# EAGLE board Keyboard_C64_noFrame (EAGLE 9.6.0)
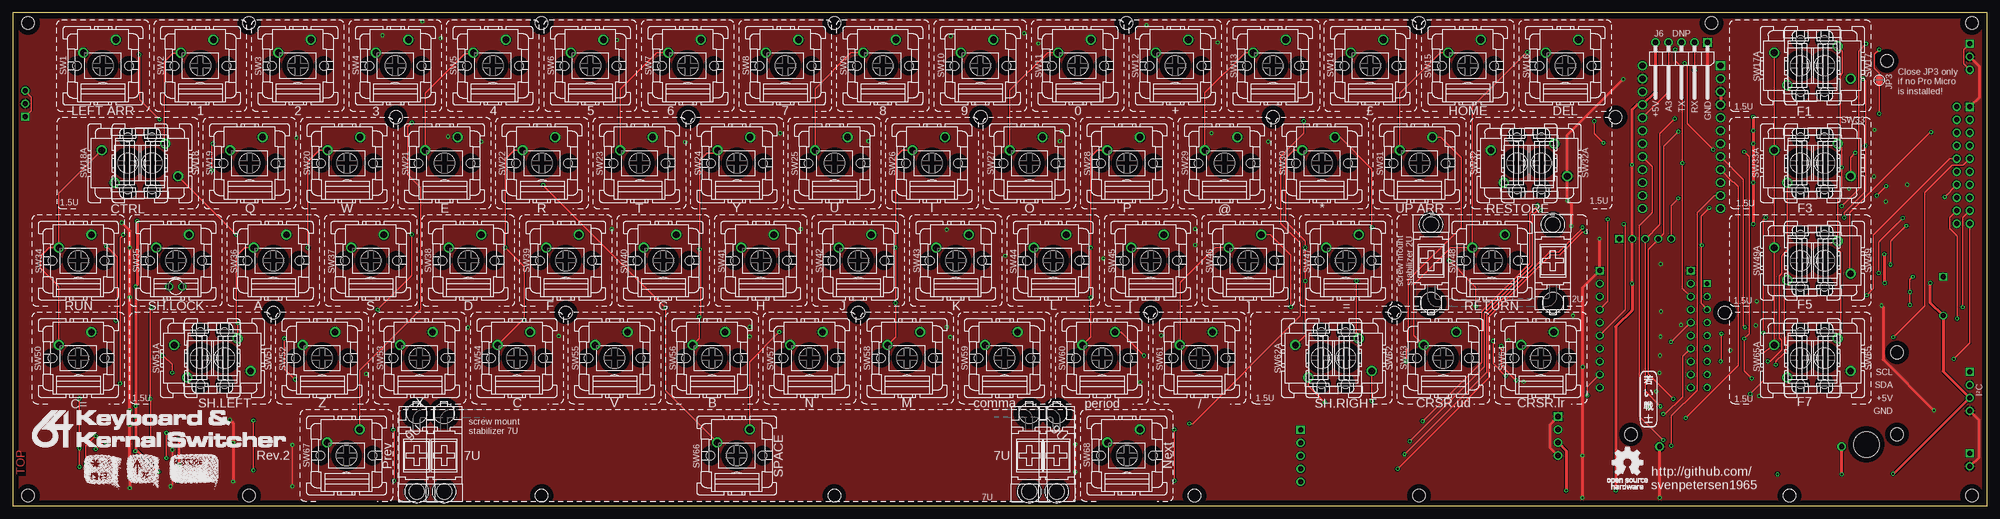
[diagram p0: board, top side]
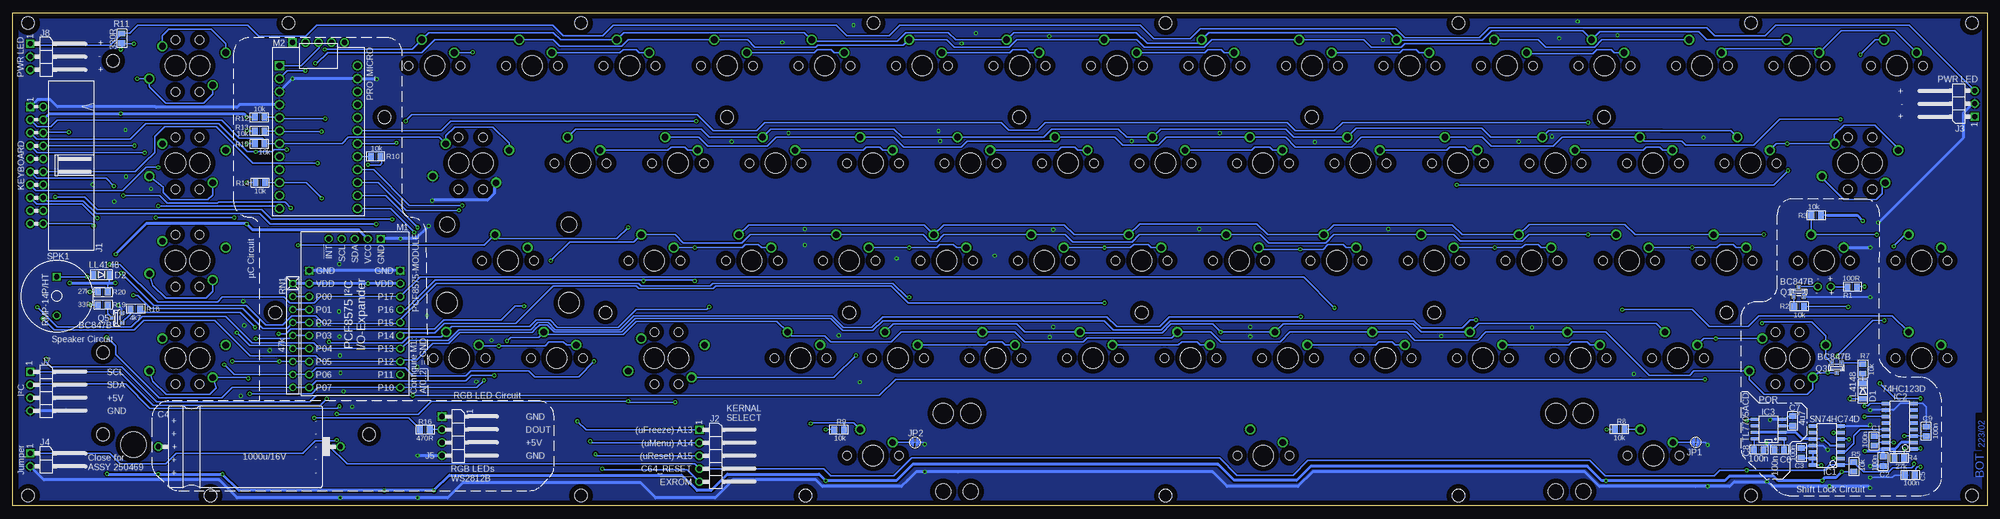
[diagram p1: board, bottom side, seen from below]

Size 385.6 x 96.4 mm. Coordinates in mm from the lower left corner, seen from the top.
Outline: 0,0 385.6,0 385.6,96.4 0,96.4 0,0
Copper layers (1*16): Top 0.035mm / dielectric 1.5mm / Bottom 0.035mm
Design rules "default *": minimum track width 6mil, minimum drill 0.35mm, track to track 6mil, track to pad 6mil, pad to pad 6mil, via to via 6mil, smd to smd 6mil, copper to edge 40mil, drill to drill 6mil, minimum pad ring 10mil, minimum via ring 8mil, stop-mask expansion 4mil, vias tented up to drill 25mil, thermal gap 10mil
Holes 2.5 mm at 3,94.4 3,2 46.16,94.4 103.29,94.4 160.44,94.4 217.52,94.4 274.64,94.4 331.76,94.4 382.6,94.4 46.16,2 103.29,2 160.44,2 274.64,2 347,2 382.6,2 74.8,76 131.92,76 189.04,76 246.14,76 313,76 50.88,37.8 108,37.8 165.12,37.8 222.24,37.8 269.84,37.8 334.34,37.8 230.8,2 316,14 368,14 368,30 366,87
Holes 5 mm at 362,12
tRestrict: area 1,92.4 to 5,96.4; area 44.2,92.4 to 48.2,96.4; area 101.3,92.4 to 105.3,96.4; area 158.4,92.4 to 162.4,96.4; area 215.5,92.4 to 219.5,96.4; area 272.6,92.4 to 276.6,96.4; area 329.8,92.4 to 333.8,96.4; area 380.6,92.4 to 384.6,96.4; area 72.8,74 to 76.8,78; area 129.9,74 to 133.9,78; area 187,74 to 191,78; area 244.1,74 to 248.1,78; 25 more areas
bRestrict: area 1,92.4 to 5,96.4; area 44.2,92.4 to 48.2,96.4; area 101.3,92.4 to 105.3,96.4; area 158.4,92.4 to 162.4,96.4; area 215.5,92.4 to 219.5,96.4; area 272.6,92.4 to 276.6,96.4; area 329.8,92.4 to 333.8,96.4; area 380.6,92.4 to 384.6,96.4; area 72.8,74 to 76.8,78; area 129.9,74 to 133.9,78; area 187,74 to 191,78; area 244.1,74 to 248.1,78; 25 more areas; 3 lines

## Footprints (pad centres in the part's own frame; a part is rotated, then mirrored left to right if it is on the bottom)
0805 = smd 1.092 x 1.397: 1 -0.94,0; 2 0.94,0
C30X16L = drill 1.016 pad 1.651: A -17.78,0; K 17.78,0
SOD80C = smd 1 x 1.6: A -1.5,0; K 1.5,0
SO-14 = smd 0.61 x 1.524: 1 -3.81,-2.794; 2 -2.54,-2.794; 3 -1.27,-2.794; 4 0,-2.794; 5 1.27,-2.794; 6 2.54,-2.794; 7 3.81,-2.794; 8 3.81,2.667; 9 2.54,2.667; 10 1.27,2.667; 11 0,2.667; 12 -1.27,2.667; 13 -2.54,2.667; 14 -3.81,2.667
SO-16 = smd 0.61 x 1.524: 1 -3.81,-2.819; 2 -2.54,-2.819; 3 -1.27,-2.819; 4 0,-2.819; 5 1.27,-2.819; 6 2.54,-2.819; 7 3.81,-2.819; 8 5.08,-2.819; 9 5.08,2.692; 10 3.81,2.692; 11 2.54,2.692; 12 1.27,2.692; 13 0,2.692; 14 -1.27,2.692; 15 -2.54,2.692; 16 -3.81,2.692
SO8 = smd 0.6 x 1.5: 1 -1.905,-2.699; 2 -0.635,-2.699; 3 0.635,-2.699; 4 1.905,-2.699; 5 1.905,2.699; 6 0.635,2.699; 7 -0.635,2.699; 8 -1.905,2.699
2X10WH = drill 1 pad 1.626 square: 1 -11.43,-1.27 | drill 1 pad 1.626: 2 -11.43,1.27; 3 -8.89,-1.27; 4 -8.89,1.27; 5 -6.35,-1.27; 6 -6.35,1.27; 7 -3.81,-1.27; 8 -3.81,1.27; 9 -1.27,-1.27; 10 -1.27,1.27; 11 1.27,-1.27; 12 1.27,1.27; 13 3.81,-1.27; 14 3.81,1.27; 15 6.35,-1.27; 16 6.35,1.27; 17 8.89,-1.27; 18 8.89,1.27; 19 11.43,-1.27; 20 11.43,1.27
1X05/90 = drill 1 pad 1.626 square: 1 -5.08,0 | drill 1 pad 1.626: 2 -2.54,0; 3 0,0; 4 2.54,0; 5 5.08,0
1X03/90 = drill 1 pad 1.626 square: 1 -2.54,0 | drill 1 pad 1.626: 2 0,0; 3 2.54,0
1X02/90 = drill 1 pad 1.626 square: 1 -1.27,0 | drill 1 pad 1.626: 2 1.27,0
1X04/90 = drill 1 pad 1.626 square: 1 -3.81,0 | drill 1 pad 1.626: 2 -1.27,0; 3 1.27,0; 4 3.81,0
CP_CL = smd 0.152 x 0.152: 1 -0.4,0; 2 0.4,0
CP_OP = smd 0.152 x 0.152: 1 -0.4,0; 2 0.4,0
PCF8575MODUL = drill 1 square: A1 -8.89,-8.5; B1 8.89,-8.5; C1 -5.08,-14.7 | drill 1: A2 -8.89,-5.96; A3 -8.89,-3.42; A4 -8.89,-0.88; A5 -8.89,1.66; A6 -8.89,4.2; A7 -8.89,6.74; A8 -8.89,9.28; A9 -8.89,11.82; A10 -8.89,14.36; B2 8.89,-5.96; B3 8.89,-3.42; B4 8.89,-0.88; B5 8.89,1.66; B6 8.89,4.2; B7 8.89,6.74; B8 8.89,9.28; B9 8.89,11.82; B10 8.89,14.36; C2 -2.54,-14.7; C3 0,-14.7; C4 2.54,-14.7; C5 5.08,-14.7
PRO_MICRO = drill 1.2 square: 1 -7.62,13.97 | drill 1.2: 2 -7.62,11.43; 3 -7.62,8.89; 4 -7.62,6.35; 5 -7.62,3.81; 6 -7.62,1.27; 7 -7.62,-1.27; 8 -7.62,-3.81; 9 -7.62,-6.35; 10 -7.62,-8.89; 11 -7.62,-11.43; 12 -7.62,-13.97; 13 7.62,-13.97; 14 7.62,-11.43; 15 7.62,-8.89; 16 7.62,-6.35; 17 7.62,-3.81; 18 7.62,-1.27; 19 7.62,1.27; 20 7.62,3.81; 21 7.62,6.35; 22 7.62,8.89; 23 7.62,11.43; 24 7.62,13.97
SOT23 = smd 0.8 x 0.9: 1 -0.953,-0.953; 2 0.953,-0.953; 3 0,0.953
RN-9 = drill 0.889 pad 1.397 square: 1 -10.16,0 | drill 0.889 pad 1.397: 2 -7.62,0; 3 -5.08,0; 4 -2.54,0; 5 0,0; 6 2.54,0; 7 5.08,0; 8 7.62,0; 9 10.16,0
RMP-14P/HT = drill 1 square: 1 0,3.8 | drill 1: 2 0,-3.8
CHERRYMX = drill 1.3: 1 -3.81,2.54; 2 2.54,5.08 | hole 4: 0,0 | hole 1.7: 5.08,0; -5.08,0
CHERRYMXLD = drill 1.3: 1 -3.81,2.54; 2 2.54,5.08 | drill 1: LDA -1.27,-5.08; LDC 1.27,-5.08 | hole 4: 0,0 | hole 1.7: -5.08,0; 5.08,0
STABIL_PIN_SCREW_L = hole 3: 0,7.05 | hole 4: 0,-8.24
STABIL_PIN_SCREW = hole 3: 0,7.05 | hole 4: 0,-8.24

## Placement (x,y rotation side)
C1  100n  [0805]  22.07,12.7 90 bottom
C2  100n  [0805]  20.32,8.73 90 bottom
C3  100n  [0805]  36.3,10.4 270 bottom
C4  1000u/16V  [C30X16L]  339.41,11.59 0 bottom
C5  100n  [0805]  15.08,6.03 0 bottom
C6  100n  [0805]  40.6,11 0 bottom
C7  4u7  [0805]  38,16.6 270 bottom
C8  100n  [0805]  44.6,11 0 bottom
C9  100n  [0805]  11.91,14.61 270 bottom
D1  LL4148  [SOD80C]  24.3,22.4 90 bottom
D2  LL4148  [SOD80C]  368.26,45.17 0 bottom
IC1  SN74HC74D  [SO-14]  31.4,11.8 90 bottom
IC2  74HC123D  [SO-16]  17.14,14.92 90 bottom
IC3  TL7705ACD  [SO8]  42.7,15 90 bottom
J1  [2X10WH]  380.93,66.6 270 bottom
J2  [1X05/90]  251.5,9.8 270 bottom
J3  [1X03/90]  2.42,78.62 90 bottom
J4  [1X02/90]  382.2,9 270 bottom
J5  [1X04/90]  301.78,13.65 270 bottom
J6  [1X05/90]  325.9,90.6 180 top
J7  [1X04/90]  382.2,22.4 270 bottom
J8  [1X03/90]  382.2,87.8 270 bottom
JP1  [CP_CL]  56.92,12.41 180 bottom
JP2  [CP_CL]  209.4,12.4 180 bottom
JP3  [CP_OP]  364.5,83.21 270 top
M1  PCF8575-MODULE  [PCF8575MODUL]  318.8,37.5 180 bottom
M2  PRO_MICRO  [PRO_MICRO]  325.9,72.1 0 bottom
Q1  BC847B  [SOT23]  36.79,41.82 0 bottom
Q3  BC847B  [SOT23]  29.4,27 180 bottom
Q5  BC847B  [SOT23]  365.26,36.73 90 bottom
R1  100R  [0805]  26.37,42.82 0 bottom
R2  10k  [0805]  36.75,39.02 0 bottom
R3  10k  [0805]  33.43,56.82 0 bottom
R4  27k  [0805]  17.14,9.37 180 bottom
R5  10k  [0805]  26.04,7.62 270 bottom
R7  10k  [0805]  24.3,26.8 90 bottom
R8  10k  [0805]  71.81,15.01 180 bottom
R9  10k  [0805]  224.23,14.89 180 bottom
R10  10k  [0805]  314.7,68.3 180 bottom
R11  330R  [0805]  364.3,91.4 270 bottom
R12  10k  [0805]  337.4,76 180 bottom
R13  10k  [0805]  337.4,73.3 180 bottom
R14  10k  [0805]  337.3,63.2 180 bottom
R15  10k  [0805]  337.4,70.8 180 bottom
R16  470R  [0805]  305.12,14.92 0 bottom
R18  4k7  [0805]  361.65,38.52 0 bottom
R19  33R  [0805]  368,39.3 0 bottom
R20  27k  [0805]  368,41.8 0 bottom
RN1  47k  [RN-9]  330.9,33.3 270 bottom
SPK1  RMP-14P/HT  [RMP-14P/HT]  377,41 0 bottom
SW1  MX  [CHERRYMX]  17.6,86.05 0 top
SW2  MX  [CHERRYMX]  36.64,86.05 0 top
SW3  MX  [CHERRYMX]  55.68,86.05 0 top
SW4  MX  [CHERRYMX]  74.72,86.05 0 top
SW5  MX  [CHERRYMX]  93.76,86.05 0 top
SW6  MX  [CHERRYMX]  112.8,86.05 0 top
SW7  MX  [CHERRYMX]  131.84,86.05 0 top
SW8  MX  [CHERRYMX]  150.88,86.05 0 top
SW9  MX  [CHERRYMX]  169.92,86.05 0 top
SW10  MX  [CHERRYMX]  188.96,86.05 0 top
SW11  MX  [CHERRYMX]  208,86.05 0 top
SW12  MX  [CHERRYMX]  227.04,86.05 0 top
SW13  MX  [CHERRYMX]  246.08,86.05 0 top
SW14  MX  [CHERRYMX]  265.12,86.05 0 top
SW15  MX  [CHERRYMX]  284.16,86.05 0 top
SW16  MX  [CHERRYMX]  303.2,86.05 0 top
SW17  MX  [CHERRYMX]  353.85,86.05 270 top
SW17A  MX  [CHERRYMX]  349.1,86.05 90 top
SW18  MX  [CHERRYMX]  27.2,67 270 top
SW18A  MX  [CHERRYMX]  22.45,67 90 top
SW19  MX  [CHERRYMX]  46.24,67 0 top
SW20  MX  [CHERRYMX]  65.28,67 0 top
SW21  MX  [CHERRYMX]  84.32,67 0 top
SW22  MX  [CHERRYMX]  103.36,67 0 top
SW23  MX  [CHERRYMX]  122.4,67 0 top
SW24  MX  [CHERRYMX]  141.44,67 0 top
SW25  MX  [CHERRYMX]  160.48,67 0 top
SW26  MX  [CHERRYMX]  179.52,67 0 top
SW27  MX  [CHERRYMX]  198.56,67 0 top
SW28  MX  [CHERRYMX]  217.6,67 0 top
SW29  MX  [CHERRYMX]  236.64,67 0 top
SW30  MX  [CHERRYMX]  255.68,67 0 top
SW31  MX  [CHERRYMX]  274.72,67 0 top
SW32  MX  [CHERRYMX]  293.76,67 90 top
SW32A  MX  [CHERRYMX]  298.51,67 270 top
SW33  MX  [CHERRYMX]  353.85,67 270 top
SW33A  MX  [CHERRYMX]  349.1,67 90 top
SW34  MX  [CHERRYMX]  12.8,47.95 0 top
SW35  MX+LED  [CHERRYMXLD]  31.84,47.95 0 top
SW36  MX  [CHERRYMX]  50.88,47.95 0 top
SW37  MX  [CHERRYMX]  69.92,47.95 0 top
SW38  MX  [CHERRYMX]  88.96,47.95 0 top
SW39  MX  [CHERRYMX]  108,47.95 0 top
SW40  MX  [CHERRYMX]  127.04,47.95 0 top
SW41  MX  [CHERRYMX]  146.08,47.95 0 top
SW42  MX  [CHERRYMX]  165.12,47.95 0 top
SW43  MX  [CHERRYMX]  184.16,47.95 0 top
SW44  MX  [CHERRYMX]  203.2,47.95 0 top
SW45  MX  [CHERRYMX]  222.24,47.95 0 top
SW46  MX  [CHERRYMX]  241.28,47.95 0 top
SW47  MX  [CHERRYMX]  260.32,47.95 0 top
SW48  MX  [CHERRYMX]  288.88,47.95 0 top
SW49  MX  [CHERRYMX]  353.85,47.95 270 top
SW49A  MX  [CHERRYMX]  349.1,47.95 90 top
SW50  MX  [CHERRYMX]  12.8,28.9 0 top
SW51  MX  [CHERRYMX]  41.36,28.9 270 top
SW51A  MX  [CHERRYMX]  36.61,28.9 90 top
SW52  MX  [CHERRYMX]  60.4,28.9 0 top
SW53  MX  [CHERRYMX]  79.44,28.9 0 top
SW54  MX  [CHERRYMX]  98.48,28.9 0 top
SW55  MX  [CHERRYMX]  117.52,28.9 0 top
SW56  MX  [CHERRYMX]  136.56,28.9 0 top
SW57  MX  [CHERRYMX]  155.6,28.9 0 top
SW58  MX  [CHERRYMX]  174.64,28.9 0 top
SW59  MX  [CHERRYMX]  193.68,28.9 0 top
SW60  MX  [CHERRYMX]  212.72,28.9 0 top
SW61  MX  [CHERRYMX]  231.76,28.9 0 top
SW62  MX  [CHERRYMX]  260.32,28.9 270 top
SW62A  MX  [CHERRYMX]  255.57,28.9 90 top
SW63  MX  [CHERRYMX]  279.36,28.9 0 top
SW64  MX  [CHERRYMX]  298.4,28.9 0 top
SW65  MX  [CHERRYMX]  353.85,28.9 270 top
SW65A  MX  [CHERRYMX]  349.1,28.9 90 top
SW66  MX  [CHERRYMX]  141.38,9.85 0 top
SW67  MX  [CHERRYMX]  65.18,9.85 0 top
SW68  MX  [CHERRYMX]  217.58,9.85 0 top
U$90  OPEN_SOURCE_HW  [OPENHW]  311.4,3.27 0 top
U$92  [KCAP_1_5U]  349.1,86.05 0 top
U$93  [KCAP_1_5U]  349.1,67 0 top
U$94  [KCAP_1_5U]  349.1,47.95 0 top
U$95  [KCAP_1_5U]  349.1,28.9 0 top
U$96  [KCAP_1_5U]  255.57,28.9 0 top
U$97  [KCAP_1_5U]  22.45,67 0 top
U$98  [KCAP_1_5U]  36.61,28.9 0 top
U$99  [KCAP_1U]  65.18,9.85 0 top
U$100  [KCAP_1U]  217.58,9.85 0 top
U$101  [KCAP_1U]  17.6,86.05 0 top
U$102  [KCAP_1U]  303.2,86.05 0 top
U$103  [KCAP_1U]  298.4,28.9 0 top
U$104  [KCAP_7U]  141.38,9.85 0 top
U$105  [KCAP_2U]  288.88,47.95 0 top
U$106  [KCAP_1_5U]  298.51,67 0 top
U$107  [KCAP_1U]  12.8,47.95 0 top
U$108  [KCAP_1U]  12.8,28.9 0 top
U$109  [KCAP_1U]  36.64,86.05 0 top
U$110  [KCAP_1U]  55.68,86.05 0 top
U$111  [KCAP_1U]  74.72,86.05 0 top
U$112  [KCAP_1U]  93.76,86.05 0 top
U$113  [KCAP_1U]  112.8,86.05 0 top
U$114  [KCAP_1U]  131.84,86.05 0 top
U$115  [KCAP_1U]  150.88,86.05 0 top
U$116  [KCAP_1U]  169.92,86.05 0 top
U$117  [KCAP_1U]  188.96,86.05 0 top
U$118  [KCAP_1U]  208,86.05 0 top
U$119  [KCAP_1U]  227.04,86.05 0 top
U$120  [KCAP_1U]  246.2,86.05 0 top
U$121  [KCAP_1U]  265.12,86.05 0 top
U$122  [KCAP_1U]  284.16,86.05 0 top
U$123  [KCAP_1U]  46.24,67 0 top
U$124  [KCAP_1U]  65.28,67 0 top
U$125  [KCAP_1U]  84.32,67 0 top
U$126  [KCAP_1U]  103.36,67 0 top
U$127  [KCAP_1U]  122.4,67 0 top
U$128  [KCAP_1U]  141.44,67 0 top
U$129  [KCAP_1U]  160.48,67 0 top
U$130  [KCAP_1U]  179.52,67 0 top
U$131  [KCAP_1U]  198.56,67 0 top
U$132  [KCAP_1U]  217.6,67 0 top
U$133  [KCAP_1U]  236.64,67 0 top
U$134  [KCAP_1U]  255.68,67 0 top
U$135  [KCAP_1U]  274.72,67 0 top
U$136  [KCAP_1U]  50.88,47.95 0 top
U$137  [KCAP_1U]  69.92,47.95 0 top
U$138  [KCAP_1U]  88.96,47.95 0 top
U$139  [KCAP_1U]  108,47.95 0 top
U$140  [KCAP_1U]  127.04,47.95 0 top
U$141  [KCAP_1U]  146.08,47.95 0 top
U$142  [KCAP_1U]  165.12,47.95 0 top
U$143  [KCAP_1U]  184.16,47.95 0 top
U$144  [KCAP_1U]  203.2,47.95 0 top
U$145  [KCAP_1U]  222.24,47.95 0 top
U$146  [KCAP_1U]  241.28,47.95 0 top
U$147  [KCAP_1U]  260.32,47.95 0 top
U$148  [KCAP_1U]  31.84,47.95 0 top
U$149  [KCAP_1U]  60.4,28.9 0 top
U$150  [KCAP_1U]  79.44,28.9 0 top
U$151  [KCAP_1U]  98.48,28.9 0 top
U$152  [KCAP_1U]  117.52,28.9 0 top
U$153  [KCAP_1U]  136.56,28.9 0 top
U$154  [KCAP_1U]  155.6,28.9 0 top
U$155  [KCAP_1U]  174.64,28.9 0 top
U$156  [KCAP_1U]  193.68,28.9 0 top
U$157  [KCAP_1U]  212.72,28.9 0 top
U$158  [KCAP_1U]  231.76,28.9 0 top
U$159  [KCAP_1U]  279.36,28.9 0 top
U$161  [2LAYER]  2.32,6.05 90 top
U$164  [C64_KEYS]  13.83,2.65 0 top
U$172  [STABIL_PIN_SCREW_L]  276.98,47.95 0 top
U$173  [STABIL_PIN_SCREW]  300.78,47.94 0 top
U$174  [STABIL_PIN_SCREW]  84.23,9.85 180 top
U$175  [STABIL_PIN_SCREW_L]  198.53,9.85 180 top
U$176  [64KB]  3.8,11.5 0 top
U$178  [SVEN_TAG]  319.5,21 0 top
U$180  [STABIL_PIN_SCREW]  78.88,9.85 180 top
U$181  [STABIL_PIN_SCREW_L]  203.88,9.85 180 top

## Library data of the parts
C1-C3 C5 R1-R5 R7-R10 R12-R16 R18-R20 = SMD
C4 = ELCO
C6-C9 R11 RN1 = DISCRETE
D1 D2 = Dioden
IC1 IC2 = 74XXsmd
IC3 = Texas_Instruments
J1-J8 = PINHEAD
JP1-JP3 = Cutpad
M1 M2 = Arduino
Q1 Q3 Q5 = Transistoren
SPK1 = KM
SW1 = CherryMX; KEY: LEFT ARR
SW2 = CherryMX; KEY: 1
SW3 = CherryMX; KEY: 2
SW4 = CherryMX; KEY: 3
SW5 = CherryMX; KEY: 4
SW6 = CherryMX; KEY: 5
SW7 = CherryMX; KEY: 6
SW8 = CherryMX; KEY: 7
SW9 = CherryMX; KEY: 8
SW10 = CherryMX; KEY: 9
SW11 = CherryMX; KEY: 0
SW12 = CherryMX; KEY: +
SW13 = CherryMX; KEY: -
SW14 = CherryMX; KEY: £
SW15 = CherryMX; KEY: HOME
SW16 = CherryMX; KEY: DEL
SW17 SW17A = CherryMX; KEY: F1
SW18 SW18A = CherryMX; KEY: CTRL
SW19 = CherryMX; KEY: Q
SW20 = CherryMX; KEY: W
SW21 = CherryMX; KEY: E
SW22 = CherryMX; KEY: R
SW23 = CherryMX; KEY: T
SW24 = CherryMX; KEY: Y
SW25 = CherryMX; KEY: U
SW26 = CherryMX; KEY: I
SW27 = CherryMX; KEY: O
SW28 = CherryMX; KEY: P
SW29 = CherryMX; KEY: @
SW30 = CherryMX; KEY: *
SW31 = CherryMX; KEY: UP ARR
SW32 SW32A = CherryMX; KEY: RESTORE
SW33 SW33A = CherryMX; KEY: F3
SW34 = CherryMX; KEY: RUN
SW35 = CherryMX; KEY: SH.LOCK
SW36 = CherryMX; KEY: A
SW37 = CherryMX; KEY: S
SW38 = CherryMX; KEY: D
SW39 = CherryMX; KEY: F
SW40 = CherryMX; KEY: G
SW41 = CherryMX; KEY: H
SW42 = CherryMX; KEY: J
SW43 = CherryMX; KEY: K
SW44 = CherryMX; KEY: L
SW45 = CherryMX; KEY: [
SW46 = CherryMX; KEY: ]
SW47 = CherryMX; KEY: =
SW48 = CherryMX; KEY: RETURN
SW49 SW49A = CherryMX; KEY: F5
SW50 = CherryMX; KEY: C=
SW51 SW51A = CherryMX; KEY: SH.LEFT
SW52 = CherryMX; KEY: Z
SW53 = CherryMX; KEY: X
SW54 = CherryMX; KEY: C
SW55 = CherryMX; KEY: V
SW56 = CherryMX; KEY: B
SW57 = CherryMX; KEY: N
SW58 = CherryMX; KEY: M
SW59 = CherryMX; KEY: comma
SW60 = CherryMX; KEY: period
SW61 = CherryMX; KEY: /
SW62 SW62A = CherryMX; KEY: SH.RIGHT
SW63 = CherryMX; KEY: CRSR.ud
SW64 = CherryMX; KEY: CRSR.lr
SW65 SW65A = CherryMX; KEY: F7
SW66 = CherryMX; KEY: SPACE
SW67 = CherryMX; KEY: Prev
SW68 = CherryMX; KEY: Next
U$90 U$164 U$176 U$178 = Logo
U$92-U$159 U$172-U$175 U$180 U$181 = CherryMX
U$161 = I-TEILE

## Nets
!C64RES: C9.2 IC1.1 IC2.3 IC3.5 J2.4 M2.11 R5.1
!EXROM: J2.5 M2.13
!INT6: M1.C5 M2.10 R14.1
!LOCK: C5.2 IC2.1 R3.1 SW35.2
!P1: M2.18 R8.1 SW67.2
!P2: M2.19 R9.1 SW68.2
!RESTORE: J1.3 M2.7 R15.1 SW32.2 SW32A.1
!SHORT_BRD: J4.1 M2.17 R10.2
+5V: C2.2 C3.2 C4.A D2.K IC1.4 IC1.10 IC1.12 IC1.13 IC1.14 IC2.2 IC2.9 IC2.11 IC2.16 IC3.2 IC3.7 J1.4 J5.3 J6.5 J7.3 JP3.2 M1.A2 M1.B2 M1.C2 M2.21 R1.2 R3.2 R4.2 R5.2 R8.2 R9.2 R10.1 R12.2 R13.2 R14.2 R15.2 R20.2 RN1.1 SPK1.2
A3: J6.4 M2.20
COL0: J1.13 M1.A10 SW16.1 SW17.1 SW17A.2 SW33.1 SW33A.2 SW48.1 SW49.1 SW49A.2 SW63.1 SW64.1 SW65.1 SW65A.2
COL1: J1.19 M1.A9 Q3.2 SW4.1 SW5.1 SW20.1 SW21.1 SW36.1 SW37.1 SW51.1 SW51A.2 SW52.1
COL2: J1.18 M1.A8 SW6.1 SW7.1 SW22.1 SW23.1 SW38.1 SW39.1 SW53.1 SW54.1
COL3: J1.17 M1.A7 SW8.1 SW9.1 SW24.1 SW25.1 SW40.1 SW41.1 SW55.1 SW56.1
COL4: J1.16 M1.A6 SW10.1 SW11.1 SW26.1 SW27.1 SW42.1 SW43.1 SW57.1 SW58.1
COL5: J1.15 M1.A5 SW12.1 SW13.1 SW28.1 SW29.1 SW44.1 SW45.1 SW59.1 SW60.1
COL6: J1.14 M1.A4 SW14.1 SW15.1 SW30.1 SW31.1 SW46.1 SW47.1 SW61.1 SW62.1 SW62A.2
COL7: J1.20 M1.A3 SW1.1 SW2.1 SW3.1 SW18.1 SW18A.2 SW19.1 SW34.1 SW50.1 SW66.1
GND: C2.1 C3.1 C4.K C5.1 C6.1 C7.1 C8.2 C9.1 IC1.7 IC1.11 IC2.8 IC2.10 IC3.4 J1.1 J3.2 J4.2 J5.1 J5.4 J6.1 J7.4 J8.2 JP1.1 JP2.1 M1.A1 M1.B1 M1.C1 M2.3 M2.4 M2.23 Q1.2 Q5.2 SW32.1 SW32A.2 SW35.1
KSW_A13: J2.1 M2.16
KSW_A14: J2.2 M2.15
KSW_A15: J2.3 M2.14
LOCK: IC1.3 IC2.13
N$1: R1.1 SW35.LDA
N$2: Q1.3 SW35.LDC
N$3: Q1.1 R2.1
N$4: C1.2 IC2.14
N$5: IC1.2 IC1.6
N$7: D1.K R7.1
N$8: Q3.1 R7.2
N$9: Q5.1 R18.1
N$10: J3.1 J3.3 J8.1 J8.3 R11.1
N$11: Q5.3 R19.2
N$12: D2.A R19.1 R20.1 SPK1.1
N$13: J5.2 R16.2
N$14: JP1.2 SW67.1
N$15: JP2.2 SW68.1
N$16: C1.1 IC2.15 R4.1
N$17: C8.1 IC3.8
N$18: C6.2 IC3.1
N$19: C7.2 IC3.3
PWRLED: JP3.1 M2.12 R11.2
RAW: M2.24
RGBOUT: M2.9 R16.1
ROW0: J1.12 M1.B3 RN1.2 SW2.2 SW4.2 SW6.2 SW8.2 SW10.2 SW12.2 SW14.2 SW16.2
ROW1: J1.11 M1.B4 RN1.3 SW1.2 SW20.2 SW22.2 SW24.2 SW26.2 SW28.2 SW30.2 SW48.2
ROW2: J1.10 M1.B5 RN1.4 SW18.2 SW18A.1 SW36.2 SW38.2 SW40.2 SW42.2 SW44.2 SW46.2 SW64.2
ROW3: J1.5 M1.B6 RN1.5 SW3.2 SW5.2 SW7.2 SW9.2 SW11.2 SW13.2 SW15.2 SW65.2 SW65A.1
ROW4: J1.8 M1.B7 RN1.6 SW17.2 SW17A.1 SW52.2 SW54.2 SW56.2 SW58.2 SW60.2 SW62.2 SW62A.1 SW66.2
ROW5: J1.7 M1.B8 RN1.7 SW33.2 SW33A.1 SW37.2 SW39.2 SW41.2 SW43.2 SW45.2 SW47.2 SW50.2
ROW6: J1.6 M1.B9 RN1.8 SW19.2 SW21.2 SW23.2 SW25.2 SW27.2 SW29.2 SW31.2 SW49.2 SW49A.1
ROW7: J1.9 M1.B10 Q3.3 RN1.9 SW34.2 SW51.2 SW51A.1 SW53.2 SW55.2 SW57.2 SW59.2 SW61.2 SW63.2
RX: J6.2 M2.2
SCL: J7.1 M1.C4 M2.6 R13.1
SDA: J7.2 M1.C3 M2.5 R12.1
SHIFTLOCK: D1.A IC1.5 R2.2
SND_OUT: M2.8 R18.2
TX: J6.3 M2.1

## Tracks (layer width: path | path; a pad name or v marks a point on that pad's centre or on a via)
!C64RES  (via drill 0.35)
  Top 0.254: v323.88,11.77 323.88,17.57 328.93,22.61 328.93,57.31 332.26,60.64 333.49,60.64 M2.11 | v46.99,16.67 46.99,7.98 | 46.99,7.94 46.99,7.98 | 46.99,7.94 46.99,7.98 | v46.99,6.99 46.99,7.94 | v14.29,8.26 14.29,11.75 v16.19,13.65
  Bottom 0.254: v323.88,11.77 320.33,8.21 252.45,8.21 J2.4 227.21,7.26 225.82,5.87 213.51,5.87 210.01,9.37 149.86,9.37 146.53,6.03 135.57,6.03 132.72,8.89 77.63,8.89 74.61,5.87 53.34,5.87 52.23,6.99 v46.99,6.99 46.67,6.99 31.75,6.99 30.75,7.99 IC1.1 28.45,8.15 26.45,8.15 R5.1 24.14,6.67 19.21,6.67 18.41,7.46 14.76,7.46 14.29,7.94 v14.29,8.26 | IC3.5 46.75,16.91 v46.99,16.67 | v16.19,13.65 IC2.3 11.92,13.65 C9.2
!EXROM  (via drill 0.35)
  Top 0.254: v270.46,7.24 288.29,25.07 288.29,36.99 294.32,43.02 300.38,49.08 302.08,49.08 306.5,53.5 v307.2,53.5
  Bottom 0.254: J2.5 253.88,7.1 270.32,7.1 v270.46,7.24 | v307.2,53.5 311.81,58.1 311.81,58.13 M2.13
!INT6  (via drill 0.35)
  Top 0.254: M1.C5 323.88,58.72 v325.29,60.12
  Bottom 0.254: R14.1 M2.10 | M2.10 328.33,63.2 325.29,60.16 v325.29,60.12 | M2.10
!LOCK  (via drill 0.35)
  Top 0.254: v20.95,23.97 20.95,52.39 v21.59,53.02 | v13.02,20.99 v13.02,11.27 v13.02,7.62
  Bottom 0.254: v20.95,23.97 17.98,20.99 v13.02,20.99 | v21.59,53.02 SW35.2 34.38,56.58 33.97,56.99 34.2,56.99 R3.1 | IC2.1 13.18,11.11 v13.02,11.27 | C5.2 13.97,6.2 13.97,7.3 13.65,7.62 v13.02,7.62
!P1  (via drill 0.35)
  Top 0.254: SW67.2 67.72,26.45 79.69,38.42 79.69,62.23 77.15,64.77 77.15,74.14 v77.95,74.93 | v308.86,75.25 308.86,72.77 v310.67,70.96
  Bottom 0.254: R8.1 69.85,15.01 69.53,15.01 69.22,15.01 67.8,15.01 SW67.2 | v77.95,74.93 125.89,74.93 127.48,73.34 135.1,73.34 136.68,74.93 183.99,74.93 185.46,73.47 191.07,73.47 192.53,74.93 238.76,74.93 240.35,73.34 248.76,73.34 251.94,76.52 307.66,76.52 308.86,75.31 v308.86,75.25 | v310.67,70.96 310.83,70.8 318.25,70.8 M2.18
!P2  (via drill 0.35)
  Top 0.254: v252.09,75.25 252.09,72.87 247.65,68.42 247.65,55.24 251.46,51.44 251.46,37.15 230.4,16.09 v229.78,16.09
  Bottom 0.254: SW68.2 221.38,16.19 223.2,16.19 | R9.1 223.2,14.98 223.2,15.89 223.2,16.19 | M2.19 301.92,73.37 300.04,75.25 v252.09,75.25 | v229.78,16.09 229.68,16.19 223.2,16.19
!RESTORE
  Bottom 0.254: SW32.2 288.68,70.88 291.88,74.07 299.34,74.07 301.05,72.36 SW32A.1 302.31,72.07 320.05,72.07 321.3,70.83 M2.7 333.55,70.8 336.39,70.8 | R15.1 336.39,70.8 | 336.39,70.8 336.55,70.96 336.55,71.6 336.87,71.91 341.34,71.91 344.83,75.41 376.87,75.41 378.14,74.14 380.85,74.14 J1.3
!SHORT_BRD  (via drill 0.35)
  Top 0.254: M2.17 320.2,66.37 320.2,57.31 317.66,54.77 317.66,17.55 v322.35,12.86
  Bottom 0.254: R10.2 M2.17 | v322.35,12.86 322.49,12.72 326.5,12.72 328.96,10.27 353.7,10.31 355.76,8.26 364.65,8.26 366.66,10.27 J4.1
+5V  (via drill 0.35)
  Top 0.152: v364.5,76.68 v364.49,76.68
  Top 0.254: v74.3,14.92 74.45,14.76 v74.45,4.92 | v226.85,14.92 v226.85,4.92 | JP3.2 v364.5,76.68
  Top 0.61: v32.23,13.02 32.38,12.86 v32.38,7.94 32.38,5.08 v32.23,4.92 | v24.29,55.72 24.29,43.18 v23.97,42.86 v23.97,19.53 v23.97,17.46 23.97,10.79 v23.89,10.72 24.37,10.72 26.27,8.81 v28.42,6.67 | v339.88,76.04 v339.88,73.34 v339.88,70.8 v339.88,63.18 v339.88,55.09 | v374.49,43.58 374.49,39.71 SPK1.2 377,26.33 J7.3 367.35,6.28 v367.21,6.28 | v365.5,49.19 365.5,43.68 v365.6,43.58 | v313.06,3.02 313.06,35.05 316.23,38.22 v316.23,43.46 316.26,43.49 M1.C2 316.26,55.06 316.23,55.09 v316.23,66.67 316.23,77.47 317.21,78.45 M2.21 320.82,80.99 J6.5 | J5.3 303.37,10.79 v303.37,3.02 | v357.19,6.19 C4.A
  Bottom 0.254: R3.2 31.29,56.82 31.27,56.83 | v23.97,42.86 25.39,42.86 R1.2 | R8.2 72.83,14.92 v74.3,14.92 | R9.2 225.2,14.92 v226.85,14.92 | R12.2 339.84,76 v339.88,76.04 | R13.2 339.84,73.3 v339.88,73.34 | R15.2 v339.88,70.8 | R20.2 367.06,43.55 367.03,43.58 | D2.K 366.76,43.63 366.71,43.58 | v316.23,66.67 313.85,66.67 313.53,66.99 313.53,68.07 R10.1 | R14.2 339.87,63.2 v339.88,63.18 | R5.2 28.4,6.68 v28.42,6.67 | IC2.9 22.86,20 23.34,19.53 v23.97,19.53 | IC2.11 v23.97,17.46
  Bottom 0.406: IC1.13 IC1.14 32.44,7.99 v32.38,7.94 | IC1.4 30.69,11.8 31.91,13.02 v32.23,13.02 32.28,13.07 IC1.10 | IC1.13 36.1,9.26 C3.2 | IC1.12 IC1.13
  Bottom 0.61: 31.27,56.83 25.4,56.83 v24.29,55.72 | v28.42,6.67 29.53,5.56 31.59,5.56 v32.23,4.92 40.8,4.92 41.75,5.87 50.32,5.87 51.28,4.92 v74.45,4.92 75.25,4.92 78.11,7.78 132.08,7.78 134.87,4.99 147.09,5.01 150.18,8.1 209.86,8.1 213.03,4.92 v226.85,4.92 228.12,6.19 246.06,6.19 249.24,3.02 251.97,3.02 254.99,6.03 300.36,6.03 v303.37,3.02 v313.06,3.02 341.47,3.02 v344.65,6.19 v357.19,6.19 367.12,6.19 v367.21,6.28 | RN1.1 M1.B2 v316.23,43.46 M1.A2 | v339.88,76.04 340.52,76.68 v364.49,76.68 378.47,76.68 J1.4 | v374.49,43.58 367.03,43.58 366.71,43.58 v365.6,43.58 | v365.5,49.19 365.5,49.23 359.45,55.28 340.08,55.28 v339.88,55.09 340,55.2 338.77,53.98 318.04,53.98 M1.C2 | 20.32,11.11 IC2.16 18.1,11.11 | 20.32,11.11 20.8,11.11 21.27,10.64 23.81,10.64 v23.89,10.72 | IC2.2 16.83,12.38 18.1,11.11 | R4.2 18.09,11.1 18.1,11.11 | C2.2 20.32,11.11 | IC1.10 36.09,13.07 37.38,14.37 IC3.2 IC3.7
A3
  Top 0.254: M2.20 323.36,80.99 J6.4
COL0  (via drill 0.35)
  Top 0.254: v295.8,88.68 295.69,88.68 285.07,78.06 SW48.1 280.84,50.49 273.64,43.3 273.64,33.34 SW63.1 | v290.67,31.27 290.67,27.47 v293.57,24.57 | SW17A.2 SW33A.2 SW49A.2 SW65A.2 341.83,29.95 341.83,24.41 v339.33,21.91 | SW17.1 357.31,88.94 357.31,84.59 356.87,84.15 356.87,71.29 SW33.1 357.19,70.01 v357.19,66.2 357.19,60.8 356.39,60.01 356.39,57.31 356.39,56.2 356.39,56.19 SW49.1 356.39,50.17 357.03,49.53 357.03,33.35 SW65.1
  Bottom 0.254: v295.8,88.68 295.89,88.59 SW16.1 | SW63.1 277.45,31.44 278.06,32.04 280.88,32.04 281.65,31.27 v290.67,31.27 294.42,31.27 SW64.1 | v293.57,24.57 295,23.14 M1.A10 326,23.14 327.23,21.91 v339.33,21.91 | J1.13 381.09,61.68 364.09,61.68 359.57,66.2 v357.19,66.2 | SW17A.2 344.01,90.33 346.87,93.19 355.12,93.19 356.39,91.92 SW17.1
COL1  (via drill 0.35)
  Top 0.254: SW5.1 89.8,88.44 88.25,88.44 80.51,80.7 SW21.1 | SW20.1 59.86,69.54 57.63,67.31 v57.63,50.49 | v57.63,50.49 v57.63,50.48 v57.63,50.49 | SW51.1 43.97,32.78 v43.97,35.72 43.66,36.04 43.66,48.9 45.25,50.49 SW36.1 | v307.5,21.59 307.5,23.27 M1.A9 | v379.1,28.73 382.2,31.84 J1.19 | v55.12,24.74 55.1,24.74 53.02,26.81 v53.02,32.71
  Bottom 0.254: SW20.1 63.38,69.54 63.98,70.14 66.58,70.14 67.19,69.54 SW21.1 | SW4.1 72.81,88.59 73.42,89.19 76.22,89.19 76.99,88.42 89.78,88.42 SW5.1 | SW36.1 48.98,50.49 49.58,51.09 52.18,51.09 52.78,50.49 v57.63,50.49 SW37.1 | v43.97,35.72 43.72,35.97 34.23,35.97 31.53,33.28 SW51A.2 31.53,29.13 Q3.2 | SW51.1 v53.02,32.71 55.32,32.71 SW52.1 | v379.1,28.73 379.1,28.1 378.14,27.15 364.33,27.15 357.5,20.32 327.59,20.32 326.32,21.59 v307.5,21.59 216.38,21.59 213.2,24.77 67.79,24.77 67.76,24.74 v55.12,24.74
COL2  (via drill 0.35)
  Top 0.254: SW23.1 118.59,81.44 125.74,88.59 SW7.1 | SW22.1 97.96,69.54 96.2,67.79 v96.2,50.49 | v96.2,50.49 v96.2,50.48 v96.2,50.49 | v96.2,50.49 99.84,46.85 v99.84,36.35 99.58,36.35 SW54.1 | v379.72,36.64 v379.73,36.65 379.73,52.79 378.3,54.22 378.3,56.35 J1.18
  Bottom 0.254: SW22.1 101.45,69.54 102.06,70.14 104.96,70.14 105.57,69.53 SW23.1 | SW6.1 110.89,88.59 111.5,89.19 114.1,89.19 114.7,88.59 SW7.1 | SW38.1 87.06,50.49 87.66,51.09 90.26,51.09 90.86,50.49 v96.2,50.49 SW39.1 | SW53.1 77.53,31.44 78.14,32.04 81.15,32.04 81.76,31.43 SW54.1 | v99.84,36.35 100.97,36.35 102.55,34.77 110.58,34.77 111.99,36.17 159.54,36.2 161.29,34.45 170.66,34.45 172.4,36.2 215.74,36.2 217.65,34.29 223.49,34.29 225.83,36.64 264.04,36.63 266.7,33.97 279.84,33.97 281.27,35.4 282.57,35.4 282.73,35.4 283.53,34.61 284.18,33.95 298.27,33.95 300.5,31.73 303.56,31.73 306.74,28.54 309.59,28.54 M1.A8 325.24,28.22 326.39,29.37 339.25,29.37 346.16,36.28 360.05,36.28 361.88,34.44 377.52,34.44 v379.72,36.64 | v99.84,36.35 99.82,36.38 v99.84,36.35
COL3  (via drill 0.35)
  Top 0.254: SW25.1 156.67,81.58 163.68,88.59 SW9.1 | SW24.1 137.08,68.99 135.53,68.99 134.14,67.6 v134.14,50.16 134.34,49.97 134.34,37.28 v134.04,36.98 134.04,32.73 SW56.1 | v380.81,38.85 380.84,38.85 380.84,56.35 J1.17
  Bottom 0.254: SW24.1 139.53,69.54 140.14,70.14 143.06,70.14 143.67,69.53 SW25.1 | SW8.1 148.97,88.59 149.58,89.19 152.18,89.19 152.78,88.59 SW9.1 | SW40.1 125.14,50.49 125.74,51.09 128.77,51.09 129.7,50.16 v134.14,50.16 141.94,50.16 SW41.1 | SW55.1 115.61,31.44 116.22,32.04 118.82,32.04 119.42,31.44 SW56.1 | v134.04,36.98 134.06,36.99 159.7,36.99 161.61,35.08 170.02,35.08 171.93,36.99 215.74,36.99 217.81,34.92 223.38,34.92 225.62,37.16 264.3,37.16 267.02,34.45 279.62,34.45 281.05,35.88 283.05,35.88 284.48,34.45 298.51,34.45 300.58,32.38 308.09,32.38 309.71,30.76 M1.A7 325.72,30.76 326.87,31.91 338.86,31.91 344.02,37.07 360.36,37.07 362.44,34.99 376.94,34.99 v380.81,38.85
COL4  (via drill 0.35)
  Top 0.254: SW27.1 194.75,81.24 202.09,88.58 SW11.1 | SW26.1 173.68,69.54 172.4,68.26 v172.4,50.48 v172.4,39.69 172.4,33.01 SW58.1 | M1.A6 314.96,38.35 314.96,54.77 v314.64,55.09
  Bottom 0.254: SW26.1 177.62,69.54 178.22,70.14 180.84,70.14 181.45,69.53 SW27.1 | SW10.1 187.06,88.59 187.66,89.19 190.26,89.19 190.87,88.59 SW11.1 | SW42.1 163.22,50.49 163.82,51.09 166.71,51.09 167.32,50.48 v172.4,50.48 SW43.1 | SW57.1 153.69,31.44 154.3,32.04 157.35,32.04 157.96,31.43 SW58.1 | M1.A6 309.4,33.81 303.21,33.81 301.31,35.72 287.34,35.72 280.04,43.02 263.84,43.02 263.36,42.55 248.76,42.55 248.28,43.02 214.05,43.02 210.71,39.69 v172.4,39.69 | v314.64,55.09 335.28,55.09 337.34,57.15 369.33,57.15 371.8,59.61 378.91,59.61 379.55,60.25 J1.16
COL5  (via drill 0.35)
  Top 0.254: SW29.1 232.83,80.75 240.67,88.59 SW13.1 | SW28.1 211.78,69.54 210.5,68.26 v210.5,50.48 v210.5,40.8 210.5,33.03 SW60.1 | v364.4,45.51 364.44,45.56 364.44,51.63 v369.11,56.3
  Bottom 0.254: SW28.1 215.69,69.54 216.3,70.14 218.9,70.14 219.5,69.54 SW29.1 | SW12.1 225.13,88.59 225.74,89.19 228.47,89.19 229.08,88.58 SW13.1 | SW44.1 201.29,50.49 201.9,51.09 204.55,51.09 205.16,50.48 v210.5,50.48 SW45.1 | SW59.1 191.78,31.44 192.38,32.04 194.98,32.04 195.59,31.44 SW60.1 | J1.15 380.93,58.98 378.78,58.98 371.99,58.98 369.31,56.3 v369.11,56.3 | v210.5,40.8 211,40.8 213.7,43.5 248.92,43.5 249.4,43.02 262.87,43.02 263.35,43.5 302.89,43.5 309.91,36.48 M1.A5 310.03,35.72 324.96,35.72 326.39,37.15 330.2,37.15 331.15,37.15 332.9,35.4 336.16,35.4 336.19,35.36 340.04,39.21 358.1,39.21 v364.4,45.51
COL6  (via drill 0.35)
  Top 0.254: SW31.1 270.91,80.73 278.77,88.59 SW15.1 | SW46.1 234.8,50.49 227.97,43.66 227.97,31.45 SW61.1 | v252.41,50.48 v252.41,50.49 | SW30.1 250.2,69.54 248.6,67.94 248.6,55.56 252.41,51.75 v252.41,50.48 | v262.41,43.97 262.38,43.94 262.38,33.19 SW62.1 | v252.41,50.48 v252.41,43.97 252.41,33.36 SW62A.2 | J1.14 379.66,62.77 v377.29,60.41 | v311.47,56.04 311.47,39.94 M1.A4
  Bottom 0.254: SW30.1 253.78,69.54 254.38,70.14 257.04,70.14 257.65,69.53 SW31.1 | SW14.1 263.21,88.59 263.82,89.19 266.42,89.19 267.02,88.59 SW15.1 | SW15.1 | SW46.1 239.38,50.49 239.98,51.09 242.58,51.09 243.19,50.49 v252.41,50.49 SW47.1 | v252.41,43.97 252.57,44.13 262.25,44.13 v262.41,43.97 262.57,43.97 262.73,44.13 303.06,44.13 308.81,38.38 M1.A4 | v377.29,60.41 371.58,60.41 369.12,57.94 337.03,57.94 335.12,56.04 v311.47,56.04
COL7  (via drill 0.35)
  Top 0.254: SW2.1 32.76,88.52 31.21,88.52 29.57,86.88 29.57,70.98 SW18.1 | SW50.1 8.99,42.92 5.4,46.51 5.4,48.74 7.15,50.49 SW34.1 8.99,61.16 SW18A.2 | SW66.1 127.48,22.48 127.48,38.42 v127.48,38.73 117.95,48.26 103.59,62.62 v103.59,62.76 | v38.89,65.56 38.89,70.65 v39.05,70.81 | v369.83,54.77 366.8,51.74 366.8,47.27 v366.7,47.18
  Bottom 0.254: SW1.1 18.07,92.87 28.55,92.87 SW2.1 33.62,89.38 51.08,89.38 SW3.1 | SW18A.2 17.37,69.86 21.96,74.45 27.94,74.45 29.84,72.55 29.84,70.92 SW18.1 v39.05,70.81 41.16,70.81 SW19.1 | v38.89,65.56 41.7,62.76 v103.59,62.76 | v127.48,38.73 133.51,44.77 306.07,44.77 M1.A3 325.48,40.92 326.71,39.69 331.47,39.69 332.58,40.8 344.65,40.8 345.6,39.85 357.31,39.85 364.47,47.01 364.64,47.18 v366.7,47.18 | v369.83,54.77 370.22,55.17 J1.20
GND  (via drill 0.35)
  Top 0.254: v54.61,11.91 v54.61,3.81 | v207.49,12.06 v207.49,6.67
  Top 0.406: v31.11,10.95 31.11,4.13 v30.8,3.81
  Top 0.61: M2.3 M2.4 | v304.39,54.73 304.39,58.99 v303.69,59.69 303.59,59.79 SW32A.2 303.59,72.49 v314.55,83.44 | v21.27,55.4 22.86,53.82 v22.86,50.48 v22.86,40.8 v22.86,18.73 v22.86,15.88 22.86,12.06 v22.86,7.78 v22.86,5.56 v22.86,3.49 | J8.2 384.02,85.98 384.02,79.85 J1.1 | v309.88,52.23 309.91,52.2 M1.A1 306.55,42.64 306.55,11.59 v306.55,9.84 v306.55,1.59 | J4.2 384.02,9.55 384.02,16.77 J7.4 | v375.2,18.69 v375.2,18.7 365.28,28.61 365.28,38.89 v364.97,39.21 | J5.1 300.2,15.88 300.2,11.43 J5.4 | v330.98,83.53 J6.1 | v42.39,16.83 43.02,16.19 v43.02,12.38 v43.02,4.76 | v321.63,1.59 C4.K
  Bottom 0.254: Q1.2 22.93,40.87 v22.86,40.8 | v364.97,39.21 364.29,38.53 364.29,37.7 Q5.2 | JP1.1 55.11,12.41 v54.61,11.91 | JP2.1 207.82,12.4 v207.49,12.06 | C6.1 42.92,12.38 v43.02,12.38 43.02,11.64 C8.2 | C7.1 38.82,17.54 39.45,16.91 IC3.4 | C5.1 18.1,6.03 18.57,5.56 19.68,5.56 v22.86,5.56 | C9.1 11.91,19.37 12.54,20 IC2.8
  Bottom 0.406: IC1.7 23.12,15.61 v22.86,15.88 | C3.1 35.33,11.34 34.87,11.8 IC1.11 32.12,11.8 31.27,10.95 v31.11,10.95 | v22.86,18.73 IC2.10 18.26,18.73 16.99,20 IC2.8
  Bottom 0.61: M2.3 v330.98,83.53 M2.23 318.19,83.44 v314.55,83.44 | SW32.1 291.59,62.82 291.59,61.02 292.86,59.75 303.63,59.75 v303.69,59.69 | v304.39,54.73 v304.39,54.72 306.88,52.23 v309.88,52.23 313.69,52.23 M1.C1 | v21.27,55.4 21.21,55.4 4.6,72.01 4.6,76.83 2.81,78.62 J3.2 | SW35.1 v22.87,50.49 v22.86,50.48 | v22.86,3.49 23.18,3.81 v30.8,3.81 41.91,3.81 42.86,4.76 v43.02,4.76 49.37,4.76 50.32,3.81 v54.61,3.81 56.99,3.81 75.72,3.81 78.58,6.67 131.76,6.67 134.62,3.81 148.43,3.81 151.29,6.67 200.98,6.67 v207.49,6.67 209.2,6.67 210.85,5.02 212.06,3.81 227.49,3.81 228.76,5.08 244.95,5.08 245.01,5.02 248.44,1.59 260.03,1.59 263.05,4.6 297.66,4.6 300.67,1.59 v306.55,1.59 v321.63,1.59 341.79,1.59 345.28,5.08 379.55,5.08 J4.2 | M2.4 341.29,78.45 341.79,77.95 357.66,77.95 357.75,78.03 376.87,78.03 378.3,79.46 380.77,79.46 J1.1 | M1.A1 M1.B1 | J7.4 382.1,18.69 v375.2,18.69 | v375.2,18.69 375.18,18.67 v375.2,18.69 | J5.4 v306.55,9.84 | C2.1 22.85,7.79 v22.86,7.78 | IC3.4 42.31,16.91 v42.39,16.83
  other vias: 69,25.8 220.2,24.2 183.1,33 182.4,35 143.9,33.1 143.9,35 106.6,33.2 88.9,34.9 117,54.1 193.8,48.9 213,48.4 230.9,51 224.3,33.3 230.9,54.1 91.5,71.2 85,72.2 55.4,72 83.6,91.4 80,94.7 72.2,92 118,91.1 204.8,73.3 204.5,71.3 197.5,92.4 183.2,91.8 200.3,90.4 221.4,94 235.3,90.6 234.1,72.9 245.2,71.2 321.85,47.29 321.7,29.4 304.7,37.2 321.8,33.1 321.6,26 321.9,38 325.8,35.4 340.4,35.3 341.1,21.5 321,22.4 319.3,19.4 306.6,27.2 292.1,32.4 295.1,24.3 365.8,59.5 370,62.8 363.5,64.4 363.6,73.5 358.6,62 340.6,40 335.4,30.4 167.1,71.3 153.9,54.1 182.4,54 131.3,71.1 149.9,72.9
  pour Top: 0.5,0.5 0.5,95.8 385,95.8 385,0.5
  pour Bottom (isolate 0.254): 0.5,0.5 385,0.5 385,95.8 0.5,95.8
KSW_A13  (via drill 0.35)
  Top 0.254: v275.33,16.56 286.86,28.09 286.86,38.03 296.23,47.4 296.23,57.15 v297.81,58.74
  Bottom 0.254: J2.1 273.65,14.88 v275.33,16.56 | v297.81,58.74 308.13,58.74 315.15,65.75 M2.16
KSW_A14  (via drill 0.35)
  Top 0.254: v272.83,12.64 287.34,27.15 287.34,37.62 296.78,47.07 296.78,56.81 297.75,57.78 v298.45,57.78
  Bottom 0.254: J2.2 272.53,12.34 v272.83,12.64 | v298.45,57.78 308.77,57.78 314.19,63.21 M2.15
KSW_A15  (via drill 0.35)
  Top 0.254: v271.81,10.12 287.81,26.12 287.81,37.31 300.18,49.67 301.92,49.67 306.57,54.32 v306.57,54.45
  Bottom 0.254: J2.3 271.49,9.8 v271.81,10.12 | v306.57,54.45 306.57,54.47 312.74,60.64 318.25,60.64 M2.14
LOCK
  Bottom 0.254: IC1.3 28.55,10.58 27.68,10.58 26.04,12.22 26.04,13.65 24.77,14.92 IC2.13
N$1
  Bottom 0.254: R1.1 30.52,42.82 SW35.LDA
N$2
  Bottom 0.254: SW35.LDC 36.69,42.87 Q1.3
N$3
  Bottom 0.254: Q1.1 37.74,39.07 R2.1
N$4
  Bottom 0.254: IC2.14 22.05,13.65 C1.2
N$5  (via drill 0.35)
  Top 0.254: v30,9.37 v30,14.29
  Bottom 0.254: IC1.2 29.9,9.26 v30,9.37 | v30,14.29 28.66,14.29 IC1.6
N$7
  Bottom 0.254: R7.1 D1.K
N$8
  Bottom 0.254: R7.2 24.51,27.95 Q3.1
N$9
  Bottom 0.254: Q5.1 364.31,35.85 362.59,37.57 R18.1
N$10
  Top 0.254: J8.1 381,89.14 381,86.44 382.18,85.26 J8.3 | J3.3 3.65,79.93 3.65,77.32 J3.1
  Bottom 0.254: J3.3 15.23,93.98 41.27,93.98 43.34,91.92 43.97,91.92 53.24,91.92 54.81,93.48 97.25,93.48 99.21,91.52 113.73,91.52 115.5,93.28 153.71,93.28 155.63,91.36 162.79,91.36 165.42,93.98 166.37,93.98 212.41,93.98 214.47,91.92 214.63,91.92 222.73,91.92 224.79,93.98 225.11,93.98 268.29,93.98 270.35,91.92 278.13,91.92 280.19,93.98 326.23,93.98 328.37,91.84 329.33,91.84 337.58,91.84 339.73,93.98 341.15,93.98 361.16,93.98 362.74,92.39 364.25,92.39 R11.1 366.6,90.04 381.9,90.04 J8.1
N$11
  Bottom 0.254: Q5.3 367.06,37.58 R19.2
N$12  (via drill 0.35)
  Top 0.254: v370.52,39.29 v370.52,41.83 370.52,44.23 v371.09,44.8
  Bottom 0.254: SPK1.1 v371.09,44.8 370.14,44.8 D2.A | v370.52,39.29 R19.1 | R20.1 368.97,41.83 v370.52,41.83
N$13
  Bottom 0.254: R16.2 J5.2
N$14
  Bottom 0.254: JP1.2 61.35,12.41 SW67.1
N$15
  Bottom 0.203: JP2.2 210.01,12.4 210.03,12.38
  Bottom 0.254: 210.03,12.38 SW68.1
N$16  (via drill 0.35)
  Top 0.254: v16.19,11.11 17.46,12.38 v18.26,12.38
  Bottom 0.254: C1.1 22.05,11.75 21.75,11.75 21.11,12.38 IC2.15 v18.26,12.38 | R4.1 16.2,11.1 v16.19,11.11
N$17
  Bottom 0.254: C8.1 45.54,12.95 IC3.8
N$18
  Bottom 0.254: C6.2 39.66,12.75 IC3.1
N$19
  Bottom 0.254: C7.2 39.98,15.66 IC3.3
PWRLED  (via drill 0.35)
  Top 0.152: JP3.1
  Top 0.254: v357.17,58.63 360.52,61.98 360.52,88.9 v361.95,90.33 | JP3.1 364.49,83.66 364.49,84.61 363.54,85.57 363.54,88.27 v364.49,89.22
  Bottom 0.254: M2.12 334,58.61 357.14,58.61 v357.17,58.63 | v361.95,90.33 364.17,90.33 R11.2 364.3,89.22 v364.49,89.22
RGBOUT  (via drill 0.35)
  Top 0.254: M2.9 335.93,63.34 336.07,63.34 337,62.41 337,27.46 v326.73,17.18
  Bottom 0.254: v326.73,17.18 308.32,17.18 R16.1
ROW0  (via drill 0.35)
  Top 0.254: v324.66,89.24 324.66,87.02 326.07,85.61 v326.07,66.99 326.07,42.54 M1.B3
  Bottom 0.254: SW2.2 54.78,91.13 56.36,92.71 75.68,92.71 SW4.2 77.27,91.13 79.01,92.87 96.79,92.87 98.63,91.03 115.24,91.03 SW6.2 115.34,91.21 116.68,92.55 152,92.55 SW8.2 154.12,90.43 164.09,90.43 166.21,92.55 190.08,92.55 SW10.2 201.46,91.13 202.88,92.55 211.17,92.55 212.89,90.83 229.28,90.83 SW12.2 229.6,91.13 231.02,92.55 266.24,92.55 SW14.2 278.61,91.13 280.04,92.55 304.32,92.55 SW16.2 307.63,89.24 v324.66,89.24 | M1.B3 RN1.2 | v326.07,66.99 338.71,66.99 345.85,74.14 355.92,74.14 357.9,72.16 357.9,69.5 357.9,69.1 359.8,67.2 361.67,65.33 J1.12
ROW1  (via drill 0.35)
  Top 0.254: v24.75,88.22 24.75,79.47 v28.65,75.56 | v265.43,54.45 265.43,65.88 259.23,72.08 SW30.2 | RN1.3 329.72,39.56 329.72,50.8 v329.88,50.96 329.72,51.12 329.72,56.67 v331.31,58.26 | v365.86,62.52 364.02,60.69 v364.01,60.69
  Bottom 0.254: SW30.2 251.63,72.08 249.87,70.33 238.28,70.33 236.53,72.08 SW28.2 213.53,72.08 211.61,70.17 200.34,70.17 199.22,71.29 182.85,71.29 SW26.2 170.43,72.08 168.84,70.48 161.93,70.48 160.33,72.08 SW24.2 137.01,72.08 135.11,70.19 124.12,70.19 122.23,72.08 SW22.2 98.59,72.08 96.84,70.33 84.76,70.33 83.01,72.08 SW20.2 67.02,71.28 59.69,71.28 58.9,70.48 45.56,70.48 40.48,75.56 v28.65,75.56 | v24.75,88.22 21.84,91.13 SW1.2 | M1.B4 RN1.3 | J1.11 380.93,64.06 378.78,64.06 367.39,64.06 v365.86,62.52 | v265.43,54.45 267.65,52.23 290.62,52.23 SW48.2 291.46,53.03 293.53,50.96 v329.88,50.96 | v331.31,58.26 332.42,59.37 345.44,59.37 345.6,59.21 355.44,59.21 356.92,60.69 v364.01,60.69
ROW2  (via drill 0.35)
  Top 0.254: v43.61,53.08 32.28,64.41 SW18.2 | v323.84,32.07 323.92,32.07 M1.B5 | v249.56,38.89 249.56,49.05 245.58,53.03 SW46.2 | v362.05,41.18 363.35,42.48 363.35,52.92 378.3,67.87 J1.10
  Bottom 0.254: SW18A.1 20.46,62.64 20.46,61.09 21.62,59.93 28.03,59.93 32.28,64.18 SW18.2 | SW46.2 241.9,54.95 207.64,54.95 205.74,53.05 SW44.2 203.82,54.95 180.21,54.95 178.28,53.03 SW42.2 165.54,55.15 142.62,55.15 140.5,53.03 SW40.2 127.66,54.95 104.48,54.95 102.56,53.03 SW38.2 89.48,55.05 70.78,55.05 68.76,53.03 SW36.2 53.37,53.08 v43.61,53.08 | M1.B5 RN1.4 332.01,34.73 336.83,34.73 340.68,38.58 358.62,38.58 361.22,41.18 v362.05,41.18 | v323.84,32.07 323.68,31.91 309.52,31.91 308.4,33.03 301.89,33.03 SW64.2 299.84,35.08 284.64,35.08 283.37,36.35 280.68,36.35 279.25,34.92 267.33,34.92 263.84,38.42 250.03,38.42 v249.56,38.89
ROW3  (via drill 0.35)
  Top 0.254: v338.14,69.22 339.09,68.26 339.09,33.66 v338.14,32.7 338.14,26.39 v339.6,24.93 v339.6,24.92 | v332.08,69.63 326.98,74.73 326.98,86.06 v326.52,86.52
  Bottom 0.254: SW3.2 75.24,91.13 76.68,89.69 86.2,89.69 87.64,91.13 SW5.2 97.07,90.36 113.78,90.36 114.44,89.69 120.33,89.69 121.76,91.12 SW7.2 151.44,91.13 152.88,89.69 164.62,89.69 166.06,91.13 SW9.2 189.54,91.13 190.98,89.69 201.77,89.69 203.21,91.13 SW11.2 211.65,90.02 228.43,90.02 228.76,89.69 240.66,89.69 242.1,91.13 SW13.2 265.42,91.13 266.7,89.85 278.76,89.85 280.04,91.13 SW15.2 303.21,91.12 305.71,88.62 324.12,88.62 326.22,86.52 v326.52,86.52 | M1.B6 RN1.5 330.94,33.34 331.57,32.7 v338.14,32.7 | J1.5 380.93,71.68 362.7,71.68 359.6,74.77 345.38,74.77 339.82,69.22 v338.14,69.22 334.96,69.22 334.55,69.63 v332.08,69.63 | v339.6,24.92 339.75,25.08 344.33,25.08 344.34,25.09 SW65A.1 345.86,23.07 347.11,21.83 355.68,21.83 358.23,24.38 SW65.2
ROW4  (via drill 0.35)
  Top 0.254: v220.92,29.42 v220.92,29.43 216.37,33.98 SW60.2 | SW66.2 143.92,28.17 v149.72,33.97 v149.72,33.98 | v361.31,83.5 361.83,82.98 v361.83,70.41 361.83,61.52 357.66,57.36 v357.66,56.36 | SW62A.1 253.03,23.47 v256.22,20.28 | SW62.2 265.43,26.33 v265.43,20.48 | v322.31,17.96 322.71,17.96 326.11,21.36 326.11,29.18 M1.B7 | v341.83,33.87 341.83,55.85 v342.34,56.36
  Bottom 0.152: 358.87,81.85 358.93,81.91 | v361.31,83.51 v361.31,83.5
  Bottom 0.254: SW52.2 64.68,35.72 99.28,35.72 SW54.2 110.5,33.98 112.08,35.56 137.52,35.56 SW56.2 v149.72,33.98 149.72,33.99 151.29,35.56 159.41,35.56 161.15,33.82 177.02,33.82 SW58.2 187.97,33.98 189.23,35.24 189.55,35.56 213.68,35.56 SW60.2 | SW62A.1 225.25,25.09 v220.92,29.42 | M1.B7 RN1.6 331.5,31.36 339.32,31.36 v341.83,33.87 | v361.83,70.41 J1.8 | v256.22,20.28 265.23,20.28 v265.43,20.48 303.87,20.48 306.42,17.93 322.29,17.93 v322.31,17.96 | v342.34,56.36 v357.66,56.36 | SW17A.1 346.55,80.49 348.3,78.74 355.76,78.74 358.87,81.85 | 358.93,81.91 SW17.2 v361.31,83.51
ROW5  (via drill 0.35)
  Top 0.254: v77.95,53.03 77.95,45.03 71.28,38.37 v71.25,38.37 | v342.74,28.26 343.22,28.26 345.44,30.48 345.44,32.38 344.96,32.86 344.96,44.93 345.44,45.4 345.44,48.9 346.56,50.02 SW33A.1 | v285.75,39.05 285.75,42.7 v280.51,47.94 | v333.69,33.66 333.69,28.42 v333.53,28.26 | SW33.2 358.93,68.13 v359.83,69.04
  Bottom 0.254: SW37.2 v77.95,53.03 89.53,53.03 90.81,51.75 102.87,51.75 104.15,53.03 SW39.2 127.63,53.03 129.22,51.44 140.34,51.44 141.93,53.03 SW41.2 165.57,53.03 167,51.59 178.59,51.59 180.03,53.03 SW43.2 203.77,53.03 205.06,51.73 206.51,51.73 207.81,53.03 SW45.2 241.61,53.03 243.21,51.44 254.63,51.44 256.23,53.03 SW47.2 264.29,51.6 276.85,51.6 v280.51,47.94 | SW50.2 18.51,37.15 44.61,37.15 46.67,35.08 54.29,35.08 57.57,38.37 v71.25,38.37 | M1.B8 RN1.7 330.94,28.26 v333.53,28.26 v342.74,28.26 | J1.7 380.83,69.04 v359.83,69.04 | v285.75,39.05 287.5,39.05 290.19,36.35 301.47,36.35 303.21,34.61 331.31,34.61 332.26,33.66 v333.69,33.66 | SW33.2 356.24,62.33 356.24,61.28 354.81,59.85 347.5,59.85 346.56,60.79 SW33A.1
ROW6  (via drill 0.35)
  Top 0.254: v374.64,73.05 374.48,73.05 358.77,57.34 358.77,45.95 SW49.2 | v272.1,28.26 272.1,30.32 272.57,30.8 272.57,44.13 282.89,54.45 282.89,68.1 278.92,72.08 SW31.2 | v344.33,27.62 344.33,28.26 345.92,29.84 346.23,30.16 346.23,32.86 345.92,33.18 345.92,43.5 SW49A.1
  Bottom 0.254: SW19.2 50.08,73.38 63.62,73.38 63.67,73.33 85.61,73.33 SW21.2 97,72.08 98.74,73.82 123.2,73.82 SW23.2 135.42,72.08 137,73.66 161.44,73.66 SW25.2 168.09,72.08 169.67,73.66 182.69,73.66 184.27,72.08 SW27.2 211.94,72.08 213.52,73.66 237.6,73.66 SW29.2 249.56,72.08 251.14,73.66 275.68,73.66 SW31.2 | v344.33,27.62 342.39,25.68 RN1.8 M1.B9 326.38,26.99 308.93,26.99 307.5,25.56 307.5,25.4 297.12,25.4 296.17,26.35 284.8,26.35 283.69,25.24 275.12,25.24 v272.1,28.26 | J1.6 379.56,73.05 v374.64,73.05 | SW49.2 358.23,43.11 355.76,40.64 347.81,40.64 346.56,41.89 SW49A.1
ROW7  (via drill 0.35)
  Top 0.254: v18.26,50.76 20.36,48.66 20.36,36.51 v20.1,36.25 | v29.25,29.33 29.41,29.33 31.11,27.62 v31.11,26.05 | v31.11,26.05 31.11,26.04 v31.11,26.05 | v367.26,32.98 373.38,39.1 373.38,61.24 378.74,66.6 380.93,66.6 J1.9 | v289.08,32.23 289.08,27.83 291.41,25.5 v291.56,25.5
  Bottom 0.254: SW51.2 46.51,26.36 | 46.51,26.36 57.3,26.36 58.1,25.56 66.04,25.56 74.46,33.98 SW53.2 97.94,33.98 99.54,32.38 111.76,32.38 113.36,33.98 SW55.2 136.2,33.98 138.11,32.07 149.7,32.07 151.61,33.98 SW57.2 159.25,32.87 175.73,32.87 176.53,32.07 187.96,32.07 189.87,33.98 SW59.2 212.08,33.98 214,32.07 225.9,32.07 227.02,33.19 233.51,33.19 SW61.2 236.36,36.04 263.84,36.04 266.38,33.5 281.42,33.5 SW63.2 282.89,32.98 288.32,32.98 v289.08,32.23 | Q3.3 v31.11,26.05 33.11,26.05 SW51A.1 34.07,22.92 35.16,21.83 43.58,21.83 46.51,24.77 46.51,26.36 | SW34.2 15.99,53.03 v18.26,50.76 | v20.1,36.25 22.33,36.25 v29.25,29.33 | v367.26,32.98 365.52,31.24 365.52,29.6 357.03,21.11 344.81,21.11 342.78,23.14 RN1.9 M1.B10 327.65,23.14 326.35,24.45 297.14,24.45 296.09,25.5 v291.56,25.5
RX  (via drill 0.35)
  Top 0.254: v328.45,85.09 328.45,90.59 J6.2
  Bottom 0.254: M2.2 331.96,85.09 v328.45,85.09
SCL  (via drill 0.35)
  Top 0.254: v325.3,73.18 322.42,70.31 322.42,53.22 321.41,52.2 M1.C4 321.34,52.1 319.4,50.16 319.4,25.8 v324.3,20.9
  Bottom 0.254: R13.1 333.59,73.3 M2.6 333.33,73.18 v325.3,73.18 | v324.3,20.9 325.52,19.68 358.14,19.68 364.67,26.21 J7.1
SDA  (via drill 0.35)
  Top 0.254: v324.59,75.68 321.67,72.77 321.67,54.99 318.88,52.2 M1.C3 318.8,22.48 v321.79,19.49
  Bottom 0.254: R12.1 333.61,76 M2.5 333.29,75.68 v324.59,75.68 | v321.79,19.49 322.19,19.09 358.82,19.09 363.54,23.81 382.06,23.81 J7.2
SHIFTLOCK  (via drill 0.35)
  Top 0.254: v26.99,13.02 26.99,20.8 v26.83,20.95 26.83,38.58 v27.15,38.89
  Bottom 0.254: IC1.5 27.2,13.07 27.15,13.02 v26.99,13.02 | v26.83,20.95 26.77,20.9 D1.A | v27.15,38.89 27.27,39.02 R2.2
SND_OUT  (via drill 0.35)
  Top 0.254: M2.8 337.98,63.83 337.98,35.24 v338.3,34.92
  Bottom 0.254: v338.3,34.92 341.15,37.78 359.97,37.78 R18.2
TX
  Bottom 0.254: M2.1 329.27,86.07 329.25,86.04 325.75,89.53 325.75,90.45 J6.3

## Text on the board
Bottom: 223/02
tNames: DNP | Close JP3 only / if no Pro Micro / is installed! | +5V | A3 | TX | RX | GND | 1.5U | 1.5U | 1.5U | 1.5U | screw mount / stabilizer 2U | 2U | 1.5U | SCL | SDA | I²C | +5V | 1.5U | 1.5U | 1.5U | GND | 9U | screw mount / stabilizer 7U | 9U | 7U | 7U | Rev.2 | http://github.com/ / svenpetersen1965 | 7U
bNames: + | 1 | - | PWR LED | + | PWR LED | + | - | + | 1 | KEYBOARD | + | - | µC Circuit | Configure M1: / A[0..2] = GND | Speaker Circuit | 1 | SCL | SDA | I²C | RGB LED Circuit | +5V | POR | 1 | GND | KERNAL / SELECT | GND | 1 | (uFreeze) A13 | DOUT | (uMenu) A14 | +5V | 1 | (uReset) A15 | GND | Close for / ASSY 250469 | Jumper | !C64_RESET | RGB LEDs / WS2812B | !EXROM | Shift Lock Circuit